# Altium PCB PoHalf.PcbDoc (part 2 of 2)
Units mm, origin at the board's own origin, x right, y up, seen from the top; angles counter-clockwise.
Board outline 104.14 x 127 mm, 4 copper layers (Power, GND, Signal, Power GND), stack 1.656 mm thick; 106 components, 89 nets, 405 pads, 56 vias.
Unrouted connection lines stored in the file: 167.
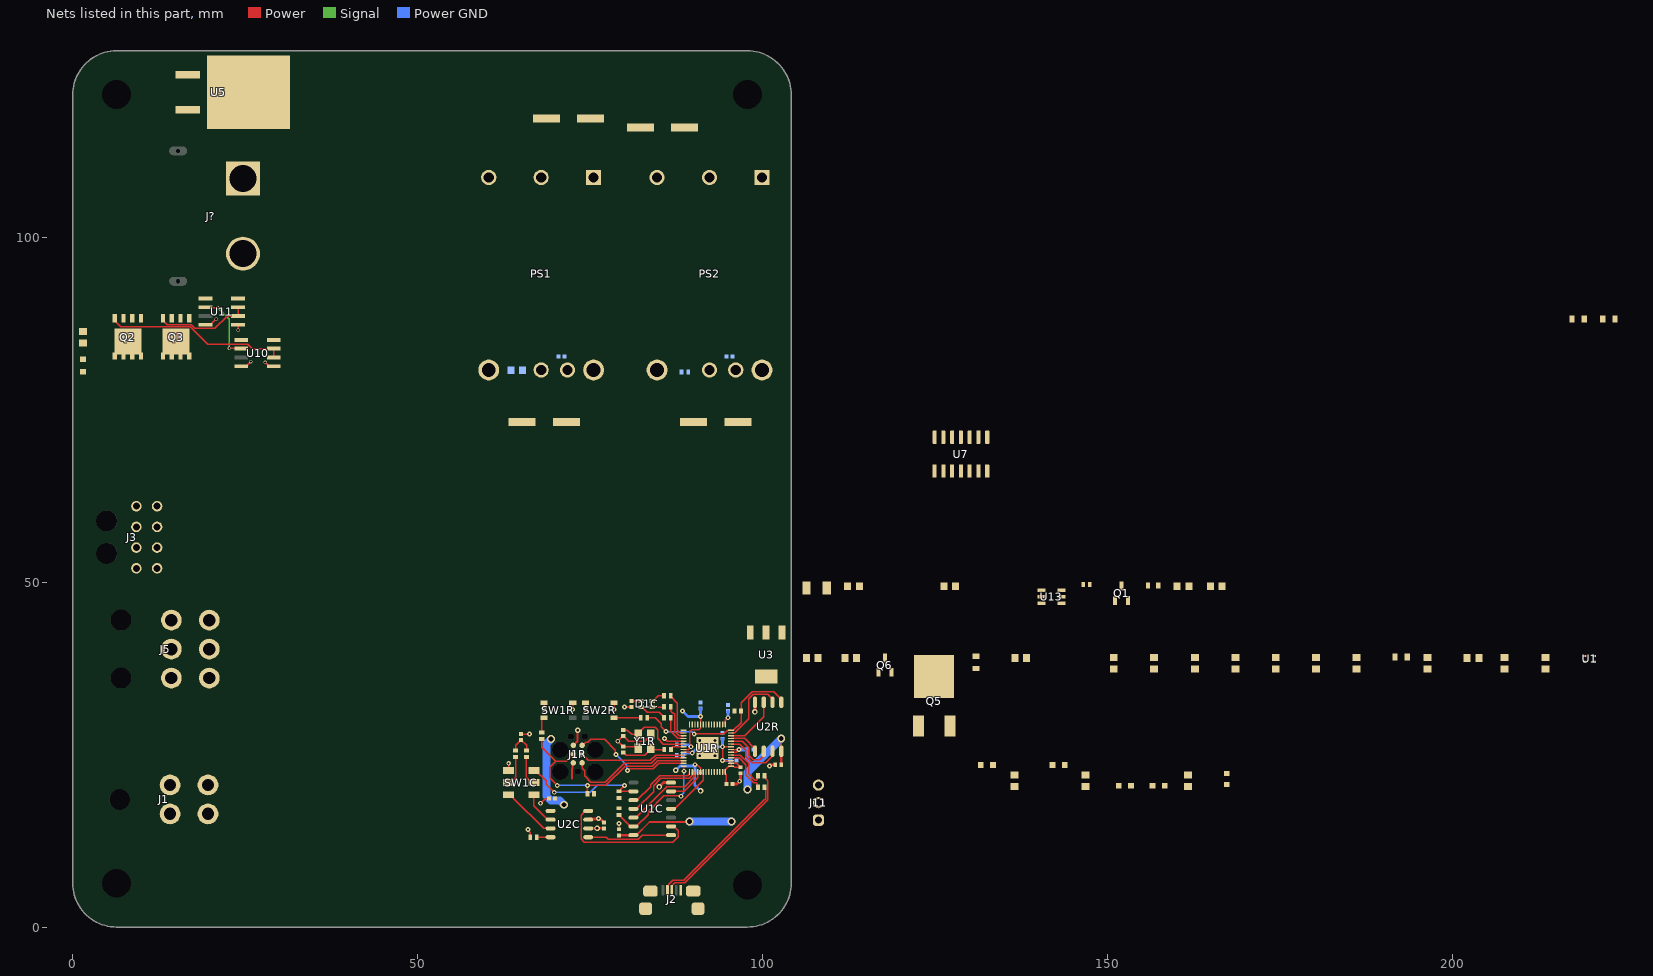
[diagram p4: the nets of this part, all layers, seen from the top]

## Part data (continued)
R20 R21 R22 R23 R27: library part RESISTOR_10K_0.5%_0603, "RES 10k OHM 0.5% 1/10W 0603", Digikey Part Numer=CR0603-JW-104ELFTR-ND, Supplier Part Number 1=749-1695-1-ND, Tolerance="+/- 0.5%", Value  (Ohms)=10K, Made By="Robert Pafford", Supplier=Digikey, Supplier 1=Digi-Key, Wattage=1/10W
R24 R25 R26: library part RESISTOR_1K_0.5%_0603, "RES 1k OHM 0.5% 1/10W 0603", Digikey Part Numer=CR0603-JW-104ELFTR-ND, Supplier Part Number 1=749-1693-1-ND, Tolerance="+/- 0.5%", Value  (Ohms)=1K, Made By="Robert Pafford", Supplier=Digikey, Supplier 1=Digi-Key, Wattage=1/10W
R32 R33: library part RESISTOR_4.7K_0603, "RES 4.7k OHM 5% 1/10W 0603", Digikey Part Numer=CR0603-JW-104ELFTR-ND, Supplier Part Number 1=RMCF0603JT4K70CT-ND, Tolerance="+/- 5%", Value  (Ohms)=4.7K, Made By="Robert Pafford", Supplier=Digikey, Supplier 1=Digi-Key, Wattage=1/10W
R39: library part ERA-3AEB512V_2, "5.1 kOhms ±0.1% 0.1W, 1/10W Chip Resistor 0603 (1608 Metric) Automotive AEC-Q200 Thin Film", Manufacturer_Part_Number=ERA-3AEB512V, Mfr_Name=Panasonic, Copyright="Copyright (C) 2023 Ultra Librarian. All rights reserved.", RefDes=RefDes, Type=DEV
R40 R44 R46: library part RESISTOR_3.9K_0603, "RES 3.9k OHM 1% 1/10W 0603", Supplier Part Number 1=P3.90KHCT-ND, Tolerance="+/- 1%", Value  (Ohms)=3.9K, Made By="Robert Pafford", Supplier 1=Digi-Key, Wattage=1/10W
SW1C: library part CAS-220TA_CAN_TERM, "GOLD SWITCH FLUSH SLIDE DPDT 100MA 6V", Current Rating="100 mA", Supplier Part Number 1=CAS220JCT-ND, Voltage Rating=6VDC, Contact Finish=Gold, Made By="Robert Pafford", Supplier 1=Digi-Key, Switch Function=DPDT
SW1R SW2R: library part "Tactile Switch SMD", "WS-TASV J-Bend SMT Tact Switch, SPST-NO, 16VDC, 50mA, 260g", Manufacturer="Wurth Elektronik", Operating Temperature Max=85°C, Operating Temperature Min=-40°C, Rated Current=50mA, Rated Voltage=16VDC, Category="Tact Switches", Circuit=SPST-NO, ComponentLink1Description="Website Link", ComponentLink1URL=https://www.we-online.com/redexpert/article/434123025826?ad, ComponentLink2Description="Datasheet Link", ComponentLink2URL=https://www.we-online.com/redexpert/spec/434123025826?ad, Contact Material="Stainless Steel", Contact Plating=Silver, Height=2.5mm, Length=4.2mm, Manufacturer Part Number=434123025826, Match Code=WS-TASV, Mount="Surface Mount", Operation Force=260g, Packaging="Tape and Reel", Terminal Material="Copper Alloy", Terminal Plating=Silver, Washable=No, Width=3.2mm
U1: library part SHT41-AD1B-R2, "Digital Relative Humidity Temperature Sensor, Â±1.8 / max 2.5 %RH, Â±0.2 Â°C, Ultra-Low-Power", Package=None, Supplier Part Number 1=1649-SHT41-AD1B-R2CT-ND, Availability="In Stock", Check_prices=https://www.snapeda.com/parts/SHT41-AD1B-R2/Sensirion/view-part/?ref=eda, MF=Sensirion, MP=SHT41-AD1B-R2, Price=None, Purchase-URL=https://pricing.snapeda.com/search/part/SHT41-AD1B-R2/?ref=eda, SnapEDA_Link=https://www.snapeda.com/parts/SHT41-AD1B-R2/Sensirion/view-part/?ref=snap, Supplier 1=Digi-Key
U1C: "CANbus Controller CAN 2.0 SPI Interface 14-SOIC", Made By="Robert Pafford", Max FD Rate="8 Mbps"
U1R: "Raspberry Pi RP2040", Crystal Frequency="12 MHz", Input Voltage=3.3V, Available Busses="SPI, I2C, PWM, USB", ComponentLink1Description=DigiKey, ComponentLink2Description=Datasheet, ComponentLink2URL=https://datasheets.raspberrypi.org/rp2040/rp2040-datasheet.pdf, Made By="Robert Pafford", Number of GPIOs=29
U2C: library part TJA1442AT, "CAN Interface IC High-Speed CAN Transceiver with Standby Mode", Supplier Part Number 1=771-TJA1442AT/0Z, Made By="Robert Pafford", Max Data Rate=5Mbps, Supplier 1=Mouser
U2R: "IC FLASH 128MBIT SPI/QUAD 8SOIC", Supplier Part Number 1=W25Q128JVSIQ-ND, Made By="Robert Pafford", Size=128M, Supplier 1=Digi-Key
U3: "800-mA 15-V linear voltage regulator 4-SOT-223 -40 to 125", Package="SOT-223-4 Texas Instruments", Arrow_Electronics-Purchase-URL=https://snapeda.com/shop?store=Arrow+Electronics&id=410186, Availability=Good, DigiKey-Purchase-URL=https://snapeda.com/shop?store=DigiKey&id=410186, MF="Texas Instruments", Mouser-Purchase-URL=https://snapeda.com/shop?store=Mouser&id=410186, MP=LM1117IMPX-3.3/NOPB, Price=None, SnapEDA_Link=https://www.snapeda.com/parts/LM1117IMPX-3.3/NOPB/Texas%20Instruments/view-part/410186/?ref=snap, Texas_Instruments-Purchase-URL=https://snapeda.com/shop?store=Texas+Instruments&id=410186
U5: "Diode Array 1 Pair Common Cathode 45 V Surface Mount TO-263-3, D²Pak (2 Leads + Tab), TO-263AB", Mfr_Name=Vishay, ComponentLink1Description="Supplier Link", ComponentLink1URL=https://www.digikey.com/en/products/detail/smc-diode-solutions/MBRB2545CT/6022901, Copyright="Copyright (C) 2023 Ultra Librarian. All rights reserved.", Manufacturer_Part_Number=MBRB2545CT, RefDes=RefDes, Type=DEV
U7: "16 Bit Analog to Digital Converter 4 Input 1 Sigma-Delta 14-SOIC", Package="SOIC-14 Microchip", Supplier Part Number 1=MCP3428-E/SL-ND, Availability=Unavailable, MF=Microchip, MP=MCP3428-E/SL, Price=None, SnapEDA_Link=https://www.snapeda.com/parts/MCP3428-E/SL/Microchip/view-part/13249/?ref=snap, Supplier 1=Digikey
U10 U11: "High-Side or Low-Side Gate Driver IC Non-Inverting 8-SOIC", Mfr_Name=Microchip, Supplier Part Number 1=TC4432EOA713CT-ND, Copyright="Copyright (C) 2024 Ultra Librarian. All rights reserved.", Manufacturer_Part_Number=TC4432EOA713, RefDes=RefDes, Supplier 1=Digikey, Type=DEV
U13: "IC SWITCH SPST-NOX1 25OHM 6TSOP", Mfr_Name=Vishay, Supplier Part Number 1=781-DG448DV-E3, Copyright="Copyright (C) 2024 Ultra Librarian. All rights reserved.", Manufacturer_Part_Number=DG448DV-T1-E3, RefDes=RefDes, Supplier 1=Mouser, Type=DEV
Y1R: library part CRYSTAL_12MHz_SMD_SMALL, "12 MHz ±20ppm Crystal 18pF 100 Ohms 4-SMD, No Lead (3.2x2.5mm)", Frequency="12 MHz", Load Capacitance=18pF, Supplier Part Number 1=2151-RH100-12.000-18-2030-EXT-TRCT-ND, ESR="100 Ohms", Made By="Robert Pafford", Supplier 1=Digi-Key

## Free pads (board coordinates)
  round 0 hole 4.191 unplated: 1(6.35,6.35) 1(6.35,120.65) 1(97.79,6.096) 1(97.79,120.65)

## Via types
v1: diameter 0.7, hole 0.3, Power to Power GND, 25 vias
v2: diameter 0.7, hole 0.3, Power to Power GND, tented top, 9 vias
v3: diameter 0.8, hole 0.4, Power to Power GND, 7 vias
v4: diameter 0.508, hole 0.305, Power to Power GND, tented both sides, 6 vias
v5: diameter 1.15, hole 0.7, Power to Power GND, 6 vias
v6: diameter 0.8, hole 0.4, Power to Power GND, tented top, 3 vias

## Nets (pads, with @x,y where several pads share a name; then routed paths per layer and width w, separated by ;. In a path a pad name is that pad's centre, name@x,y a point inside that pad or via, vN(x,y) a via of type N, cw(c..) or ccw(c..) an arc to the next point about the centre after c; other vN are vias at no path point)
1v1_RP2040: C11R.1 C12R.1 C13R.1 U1R.23 U1R.45 U1R.50 | length 14.4
  Power w0.2: U1R.23@88.554,25.337 89.456,25.337 89.656,25.137 v1@89.792,25.137 ; U1R.45@95.429,24.137 v1(94.192,24.137) v1(94.192,26.137) U1R.50@95.429,26.137
  Power GND w0.4: C12R.1@88.427,24.937 88.427,24.957 88.607,25.137 88.627,25.137 88.729,25.239 v1(89.792,25.239) 90.689,26.137 v1(94.192,26.137) C13R.1@94.192,27.302 ; v1(94.192,24.137) C11R.1@95.357,24.137
3V3_MEAS: R23.2 R27.1 U7.1
3V3_RP2CAN: C1.1 C1C.1 C3C.1 C3R.1 C4.1 C4R.1 C5C.1 C5R.1 C6R.1 C7R.1 C8R.1 C9R.1 C10R.1 C17.1 D1C.4 J1R.2 R1C.1 R2.1 R4C.1 R4R.1 R5R.1 R10.1 R23.1 R32.1 R33.1 R34.1 R39.1 U1.3 U1C.14 U1R.1 U1R.10 U1R.22 U1R.33 U1R.42 U1R.43 U1R.44 U1R.48 U1R.49 U2C.5 U2R.8 U3.2 U3.4 U7.6 | length 81.6
  Power w0.2: C1C.1@79.192,13.302 C1C.1@79.204,13.314 ; U1R.22@88.554,25.737 89.192,25.737 v1(89.592,26.137) 89.592,26.272 89.425,26.438 89.425,28.37 89.692,28.637 90.345,28.637 90.757,28.637 90.992,28.871 U1R.10@90.992,29.374 v1(90.992,30.537) ; v2(90.192,23.537) 90.287,23.441 90.553,23.441 90.992,23.002 U1R.33@90.992,22.499 ; U1R.1@94.592,29.374 94.592,30.01 94.918,30.337 v1(94.992,30.337) ; C10R.1@94.757,20.737 94.757,22.044 94.639,22.162 94.592,22.162 U1R.42@94.592,22.499 94.592,22.837 U1R.43@95.092,23.337 ; U1R.48@95.429,25.337 96.167,25.337 v2(96.567,25.737) U1R.49@95.429,25.737 ; C4R.1@96.792,23.172 C4R.1@96.772,23.172 ; C4R.1@96.772,23.172 96.592,23.352 96.592,23.372 96.227,23.737 U1R.44@95.429,23.737 U1R.43@95.429,23.337 95.767,23.337 95.932,23.172 C4R.1@96.772,23.172
  Power w0.25: C5C.1@80.992,32.84 81.053,32.779 82.384,32.779 D1C.4@82.392,32.787 ; U1C.14@81.254,13.314 81.679,13.314 83.607,15.242 89.329,15.242 v5(89.402,15.315) ; U2R.8@102.697,25.488 v5(102.697,27.337)
  Power w0.254: C5C.1@80.992,32.786 C5C.1@80.992,32.84
  Power w0.3: 72.392,21.537 72.343,21.585 72.343,22.888 72.463,23.008 72.463,23.713 J1R.2@72.557,23.807
  Power w0.4: C1C.1@79.204,13.314 U1C.14@81.254,13.314 ; C3R.1@102.697,23.537 U2R.8@102.697,25.488
  Power GND w0.4: v6(87.392,22.737) 88.002,23.347 88.902,23.347 88.912,23.337 89.992,23.337 v2(90.192,23.537) ; v1(88.392,31.337) 89.192,30.537 v1(90.992,30.537) C6R.1@90.992,31.702 ; C8R.1@88.427,26.439 89.154,26.439 89.456,26.137 v1(89.592,26.137) ; v2@90.174,23.337 90.174,22.454 C9R.1@90.157,22.437 90.157,20.572 v6(90.992,19.737) ; v1(94.992,30.337) C7R.1@94.992,31.302
  Power GND w0.6: v2(96.567,25.737) C5R.1@97.757,25.737 97.757,24.372 98.744,23.384
  Power GND w1.15: v5(69.336,27.253) 69.336,27.238 68.641,26.544 68.641,19.026 69.326,18.342 70.587,18.342 v5(71.192,17.737) ; v5(89.402,15.315) v5(95.498,15.315) ; v5(97.792,19.937) 97.792,22.432 98.744,23.384 v5(102.697,27.337)
5V: C3.1 C4C.1 C12.1 C80.1 J5.5 PS2.7 PS2.8 Q5.2 R7.1 R22.1 R42.1 U2C.3 U3.3 | length 2.6
  Power w0.4: U2C.3@74.717,15.572 74.793,15.648 76.103,15.648 v1(76.192,15.737) 76.287,15.641 76.502,15.641 76.972,15.172 C4C.1@76.992,15.172
5V_MEAS: R22.2 R26.1 U7.13
12V: C9.1 C81.1 J5.6 PS1.7 PS1.8 R21.1
12V_MEAS: R21.2 R25.1 U7.11
AUX_SWITCH: J1.4 R34.2 U1R.2
CANCLK_RP2CAN: U1C.6 U1R.32 | length 5.5
  Power w0.2: U1C.6@86.717,19.677 88.604,19.677 90.592,21.665 U1R.32@90.592,22.499
CANH: J5.4 SW1C.4 U2C.7 | length 8.6
  Power w0.2: SW1C.4@63.142,19.187 63.442,19.187 63.842,18.787 63.842,18.702 68.242,14.302 U2C.7@69.267,14.302 U2C.7@69.692,14.302
CANL: J5.1 SW1C.1 U2C.6 | length 5.3
  Power w0.203: SW1C.1@66.842,19.187 66.842,17.572 68.842,15.572 U2C.6@69.267,15.572 U2C.6@69.692,15.572
CANRX_RP2CAN: U1C.2 U2C.4 | length 21.5
  Power w0.2: U2C.4@74.717,16.842 74.292,16.842 73.692,16.242 73.692,12.783 74.153,12.322 86.985,12.322 87.742,13.078 87.742,13.997 87.142,14.597 U1C.2@86.717,14.597
CANTX_RP2CAN: U1C.1 U2C.1 | length 12.4
  Power w0.2: U2C.1@74.717,13.032 77.316,13.032 77.626,12.722 81.935,12.722 82.54,13.327 U1C.1@86.717,13.327
DBG_TX_RP2040: J1R.5 U1R.27 | length 18.2
  Power w0.2: J1R.5@73.827,26.347 73.865,26.347 74.336,26.818 74.667,26.818 75.096,27.247 77.081,27.247 78.662,25.667 78.662,25.107 v1(78.742,25.027) ; v1(80.392,22.687) 80.509,22.687 80.759,22.937 84.173,22.937 84.973,23.737 U1R.27@88.554,23.737
  Power GND w0.2: v1(78.742,25.027) 80.297,23.472 80.297,22.781 v1(80.392,22.687)
DC_MOTOR_1: J3.5 J3.6 J3.7 J3.8
FAN_PWR: J11.2 Q5.3
FAN_SWITCH: Q6.1 R9.1 U1R.40
FAN_TACH: J11.1 R10.2 U1R.41
GND: C1.2 C1C.2 C1R.2 C2.2 C2C.1 C2R.2 C3.2 C3C.2 C3R.2 C4.2 C4C.2 C4R.2 C5C.2 C5R.2 C6R.2 C7.2 C7R.2 C8R.2 C9.2 C9R.2 C10.2 C10R.2 C11R.2 C12.2 C12R.2 C13R.2 C17.2 C80.2 C81.2 D1.2 D2.2 D3.2 D5.2 D8.2 J1.1 J1.2 J1R.6 J2.5 J2.6 J2.7 J2.8 J2.9 J3.1 J3.2 J3.3 J3.4 J5.2 J11.3 J?.N PS1.2 PS1.3 PS1.4 PS2.2 PS2.3 PS2.4 Q1.2 Q6.2 R3.1 R6C.2 R9.2 R12.2 R13.2 R24.2 R25.2 R26.2 R27.2 SW1C.6 SW1R.B1 SW1R.B2 SW2R.B1 SW2R.B2 U1.4 U1C.7 U1R.19 U1R.57 U2C.2 U2R.4 U3.1 U7.2 U7.4 U7.5 U7.9 U7.10 U7.12 U7.14 U10.4 U10.5 U11.4 U11.5 U13.2 U13.4 Y1R.2 Y1R.4 | length 40.5
  Power w0.2: U11.4@19.238,87.295 19.949,87.295 20.754,88.1 v4(20.8,88.1) ; U11.5@23.962,87.295 23.962,86.538 v4(24,86.5) ; U10.4@24.438,81.295 25.149,81.295 v4(25.8,81.946) ; v4@27.9,81.9 27.9,81.846 28.451,81.295 U10.5@29.162,81.295 ; SW1C.6@63.142,22.687 63.192,22.737 v2(63.192,23.737) ; C2C.1@64.992,27.972 v1(66.192,27.972) ; v1(65.992,14.137) 65.992,14.032 66.317,13.707 R6C.2@66.317,13.032 ; v1(67.807,17.952) 68.46,18.605 69.016,18.605 C3C.2@69.028,18.617 ; v1(68.317,31.537) SW1R.B2@68.317,32.487 ; v1(72.467,31.537) 72.467,32.389 SW1R.B1@72.47,32.392 ; v1(74.317,31.537) SW2R.B2@74.317,32.487 ; v1(78.467,31.537) SW2R.B1@78.467,32.487 ; v2(85.792,27.337) 86.192,26.937 U1R.19@88.554,26.937 ; U1R.57@90.792,26.937 v3(90.892,27.037)
  Power w0.203: SW1R.B1@72.402,32.46 SW1R.B1@72.47,32.392 ; v1(78.992,26.937) v1@79.007,26.937 ; C1C.2@79.192,14.118 C1C.2@79.192,14.172 v1(79.192,15.007) ; Y1R.2@81.992,25.905 81.724,26.172 C2R.2@79.792,26.172 79.772,26.172 v1@79.007,26.937 ; Y1R.4@83.77,27.937 83.77,27.787 82.918,26.935 80.578,26.935 79.812,27.702 C1R.2@79.792,27.702 79.772,27.702 v1@79.007,26.937
  Power w0.25: v1(79.992,31.902) C5C.2@80.992,31.902
  Power w0.3: J1R.6@72.557,26.347 73.189,26.979 v3(73.189,28.545)
  Power w0.4: U2C.2@74.717,14.302 74.734,14.319 75.974,14.319 v3(75.992,14.337) 76.009,14.319 76.974,14.319 C4C.2@76.992,14.302 ; v3(85.005,20.323) 85.628,20.947 U1C.7@86.717,20.947 ; C10R.2@95.627,20.737 95.632,20.731 96.261,20.731 v1(96.667,21.137) 96.667,21.218 96.792,21.343 C4R.2@96.792,22.302 ; v6(98.887,31.184) U2R.4@98.887,32.588 ; v1(100.992,23.337) 101.192,23.537 C3R.2@101.827,23.537
  other v3: 90.892,24.837 93.092,24.837 93.092,27.037
  other v4: 27.909,81.839
INT_RP2CAN: U1C.4 U1R.34 | length 7.5
  Power w0.2: U1C.4@86.717,17.137 87.25,17.137 91.392,21.278 U1R.34@91.392,22.437
KILL_FEEDBACK: Q1.3 R2.2
KILL_SWITCH: J1.3 R8.2
LEDB_RP2CAN: R8C.1 U1R.18 | length 4.3
  Power w0.2: R8C.1@86.667,30.337 86.667,28.39 87.719,27.337 U1R.18@88.554,27.337
LEDG_RP2CAN: R7C.1 U1R.17 | length 5.4
  Power w0.2: R7C.1@86.667,31.937 86.667,31.337 86.917,31.086 86.991,31.086 87.242,30.836 87.242,28.38 87.885,27.737 U1R.17@88.554,27.737
LEDR_RP2CAN: R5C.1 U1R.16 | length 6.5
  Power w0.2: R5C.1@86.667,33.537 86.667,33.437 87.642,32.462 87.642,28.546 88.051,28.137 U1R.16@88.554,28.137
MISO_RP2CAN: U1C.12 U1R.31 | length 12.1
  Power w0.2: U1C.12@81.267,15.867 81.583,15.867 86.063,20.347 88.708,20.347 90.192,21.83 U1R.31@90.192,22.499
MOSI_RP2CAN: U1C.11 U1R.30 | length 11.5
  Power w0.2: U1C.11@81.267,17.137 81.692,17.137 84.192,19.637 84.192,20.5 85.238,21.547 89.342,21.547 89.792,21.996 U1R.30@89.792,22.499
MOTOR_EN: R1.1 R5.2 U13.6
MOTOR_PWR: Q2.D Q3.D R46.1
nCS_RP2CAN: R4C.2 U1C.13 U1R.28 | length 16.4
  Power w0.2: R4C.2@79.192,16.262 79.292,16.262 79.467,16.087 79.467,15.972 80.842,14.597 U1C.13@81.267,14.597 81.692,14.597 83.398,16.303 83.398,16.743 85.662,19.007 88.122,19.007 v2(88.161,18.967) ; U1R.28@88.554,23.337 88.592,23.337 v2(88.592,22.597)
  Power GND w0.2: v2(88.161,18.967) 88.161,19.025 88.592,19.456 v2(88.592,22.597)
NetC2_1: C2.1 Q1.1 R6.2 R8.1 U13.1
NetC2C_2: C2C.2 R2C.2 R3C.2 | length 3.7
  Power w0.2: R3C.2@64.192,25.612 64.192,26.322 64.972,27.102 C2C.2@64.992,27.102 65.012,27.102 65.792,26.322 R2C.2@65.792,25.612
NetC2R_1: C2R.1 R1R.2 Y1R.3 | length 6.7
  Power w0.203: C2R.1@79.792,25.302 79.812,25.302 80.21,24.903 82.918,24.903 83.77,25.755 Y1R.3@83.77,25.905 83.938,25.737 R1R.2@85.743,25.737
NetD1_1: D1.1 R40.2
NetD1C_1: D1C.1 R5C.2 | length 2
  Power w0.2: D1C.1@83.992,32.787 84.117,32.787 84.867,33.537 R5C.2@85.717,33.537
NetD1C_2: D1C.2 R7C.2 | length 1.7
  Power w0.2: D1C.2@83.992,31.887 85.667,31.887 R7C.2@85.717,31.937
NetD1C_3: D1C.3 R8C.2 | length 4
  Power w0.2: D1C.3@82.392,31.887 82.517,31.887 83.242,31.162 84.991,31.162 85.717,30.437 R8C.2@85.717,30.337
NetD2_1: D2.1 R39.2
NetD3_1: D3.1 R42.2
NetD5_1: D5.1 R44.2
NetD8_1: D8.1 R46.2
NetPS1_6: PS1.6 R12.1
NetPS2_6: PS2.6 R13.1
NetQ2_4: Q2.4 U10.6 U10.7 | length 26.4
  Power w0.2: Q2.4@6.095,88.23 6.095,87.9 6.986,87.01 17.05,87.01 19.56,84.5 25.364,84.5 26.029,83.835 U10.7@29.162,83.835 U10.6@29.162,82.565
NetQ3_4: Q3.4 U11.6 U11.7 | length 13.7
  Power w0.2: Q3.4@13.095,88.23 13.095,87.9 13.696,87.3 17.17,87.3 17.681,86.789 20.589,86.789 22.365,88.565 U11.6@23.962,88.565 U11.7@23.962,89.835
NetQ5_1: Q5.1 Q6.3 R7.2
NetR2C_1: R2C.1 SW1C.2 | length 4.4
  Power w0.2: R2C.1@65.792,24.662 65.742,24.612 65.742,21.737 66.542,20.937 SW1C.2@66.842,20.937
NetR3C_1: R3C.1 SW1C.5 | length 4.4
  Power w0.2: SW1C.5@63.142,20.937 63.442,20.937 64.242,21.737 64.242,24.612 R3C.1@64.192,24.662
NetR5_1: R5.1 U10.2 U11.2 | length 10.1
  Power w0.2: U11.2@19.238,89.835 19.273,89.8 v4(21,89.8) ; v4(22.7,83.9) 24.373,83.9 U10.2@24.438,83.835
  Signal w0.2: v4(21,89.8) 22.7,88.1 v4(22.7,83.9)
NetR6C_1: R6C.1 U2C.8 | length 2
  Power w0.2: R6C.1@67.267,13.032 U2C.8@69.267,13.032
NetR6R_1: R6R.1 SW1R.A2 | length 2.3
  Power w0.2: R6R.1@67.992,28.212 67.992,30.112 68.217,30.337 SW1R.A2@68.317,30.337
NetR7R_1: R7R.1 SW2R.A1 | length 3.8
  Power w0.2: SW2R.A1@78.467,30.337 R7R.1@82.317,30.337
NetU1R_5: U1R.5
NetU1R_8: U1R.8
NetU1R_9: U1R.9
NetU1R_11: U1R.11
NetU1R_12: U1R.12
NetU1R_13: U1R.13
NetU1R_14: U1R.14
NetU1R_15: U1R.15
NetU1R_35: U1R.35
NetU1R_36: U1R.36
NetU1R_37: U1R.37
NetU1R_38: U1R.38
NetU1R_39: U1R.39
PHYS_KILL: U1R.3
QSPI_SCLK_RP2040: U1R.52 U2R.6 | length 7.3
  Power w0.2: U1R.52@95.429,26.937 97.022,26.937 97.992,25.967 97.992,24.883 98.638,24.237 99.557,24.237 100.157,24.837 U2R.6@100.157,25.387
QSPI_SD0_RP2040: U1R.53 U2R.5 | length 4.5
  Power w0.2: U1R.53@95.429,27.337 97.392,27.337 98.887,25.842 U2R.5@98.887,25.387
QSPI_SD1_RP2040: U1R.55 U2R.2 | length 10.9
  Power w0.2: U1R.55@95.429,28.137 95.932,28.137 97.992,30.196 97.992,33.092 98.638,33.738 100.405,33.738 100.406,33.737 100.727,33.737 101.427,33.037 U2R.2@101.427,32.487
QSPI_SD2_RP2040: U1R.54 U2R.3 | length 7.9
  Power w0.2: U1R.54@95.429,27.737 97.392,27.737 100.157,30.502 U2R.3@100.157,32.487
QSPI_SD3_RP2040: U1R.51 U2R.7 | length 8.6
  Power w0.2: U1R.51@95.429,26.537 96.686,26.537 97.579,25.643 97.579,24.73 98.472,23.837 100.427,23.837 101.427,24.837 U2R.7@101.427,25.387
QSPI_SS_RP2040: R5R.2 R7R.2 U1R.56 U2R.1 | length 25.6
  Power w0.2: R7R.2@83.267,30.337 84.459,30.337 85.303,29.493 85.303,29.026 v2(85.992,28.337) ; v2(90.075,27.987) 94.376,27.987 94.926,28.537 U1R.56@95.429,28.537 ; U1R.56@95.767,28.537 96.867,29.637 R5R.2@96.867,31.337 96.867,32.532 98.472,34.138 101.595,34.138 102.697,33.037 U2R.1@102.697,32.487
  Power GND w0.2: v2(85.992,28.337) 89.708,28.337 90.058,27.987 v2(90.075,27.987)
RUN_RP2040: J1R.4 R4R.2 R6R.2 U1R.26 | length 32.4
  Power w0.2: R6R.2@67.992,27.262 67.992,26.096 70.016,24.072 ; v1(70.225,20.537) 70.192,20.537 69.116,21.612 69.116,23.173 70.016,24.072 ; J1R.4@72.557,25.077 71.552,24.072 70.016,24.072 ; R4R.2@74.592,19.337 v1(74.592,20.537) 77.272,20.537 80.072,23.337 84.007,23.337 84.807,24.137 U1R.26@88.554,24.137
  Power GND w0.2: v1(70.225,20.537) v1(74.592,20.537)
SCK_RP2CAN: U1C.10 U1R.29 | length 10.2
  Power w0.2: U1C.10@81.267,18.407 81.781,18.407 83.746,20.372 83.746,20.62 85.073,21.947 89.176,21.947 89.392,22.162 U1R.29@89.392,22.499
SCL: R33.2 U1.2 U1R.7 U7.8
SDA: R32.2 U1.1 U1R.6 U7.7
SOFTWARE_KILL: R3.2 U1R.4 U13.3
SWCLK_RP2040: J1R.3 U1R.24 | length 15.4
  Power w0.2: J1R.3@73.827,25.077 74.727,24.177 83.716,24.177 84.476,24.937 U1R.24@88.554,24.937
SWDIO_RP2040: J1R.1 U1R.25 | length 18.3
  Power w0.2: J1R.1@73.827,23.807 73.827,23.031 74.196,22.661 74.196,21.901 75.096,21.002 77.159,21.002 79.934,23.777 83.881,23.777 84.641,24.537 U1R.25@88.554,24.537
TERM_DET_RP2CAN: R1C.2 SW1C.3 U1C.9 | length 18.4
  Power w0.2: SW1C.3@66.842,22.687 67.142,22.687 68.621,21.207 68.621,20.707 v1(69.792,19.537) ; R1C.2@79.192,19.677 R1C.2@79.292,19.677 ; v2(79.992,20.537) 79.467,20.012 79.467,19.852 R1C.2@79.292,19.677 ; U1C.9@81.267,19.677 R1C.2@79.292,19.677
  Power GND w0.2: v1(69.792,19.537) 74.992,19.537 75.992,20.537 v2(79.992,20.537)
USB_N: J2.2 R3R.1 | length 22
  Power w0.2: J2.2@86.188,5.342 86.188,5.992 86.288,6.092 86.294,6.092 86.411,6.209 86.411,6.227 86.955,6.771 88.559,6.771 100.163,18.375 100.416,18.628 100.416,20.11 R3R.1@100.267,20.26 R3R.1@100.361,20.355
USB_P: J2.3 R2R.1 | length 23.5
  Power w0.2: J2.3@86.838,5.342 86.838,5.992 86.938,6.092 86.944,6.092 87.061,6.209 87.061,6.227 87.253,6.419 88.705,6.419 100.516,18.229 100.769,18.482 100.769,21.235 100.641,21.362 100.559,21.362 100.442,21.479 100.442,21.762 R2R.1@100.267,21.937
USB_RP2040_N: R3R.2 U1R.46 | length 6.8
  Power w0.2: U1R.46@95.429,24.537 96.582,24.537 97.556,23.563 97.556,22.058 98.715,20.898 99.105,20.898 99.222,20.781 99.222,20.355 R3R.2@99.317,20.26
USB_RP2040_P: R2R.2 U1R.47 | length 6.8
  Power w0.2: U1R.47@95.429,24.937 96.748,24.937 97.956,23.729 97.956,22.223 98.881,21.298 99.105,21.298 99.222,21.415 99.222,21.842 R2R.2@99.317,21.937
V+: J5.3 J?.P Q2.1 Q2.2 Q2.3 Q3.1 Q3.2 Q3.3 R1.2 R6.1 R44.1 U5.1 U5.3 U10.1 U10.8 U11.1 U11.8 U13.5
Vreg: C7.1 C10.1 PS1.1 PS2.1 R20.1 R40.1 U5.2
Vreg_MEAS: R20.2 R24.1 U7.3
XIN_RP2040: C1R.1 U1R.20 Y1R.1 | length 11.3
  Power w0.2: C1R.1@79.792,28.572 79.824,28.539 80.392,28.539 80.994,27.937 Y1R.1@81.992,27.937 81.992,28.087 82.842,28.937 84.444,28.937 84.792,28.589 84.792,27.337 85.592,26.537 U1R.20@88.554,26.537
XOUT_RP2040: R1R.1 U1R.21 | length 2.1
  Power w0.2: R1R.1@86.693,25.737 86.693,25.837 86.993,26.137 U1R.21@88.554,26.137
pads on no net: J1. J1R.A J1R.B J1R.C J1R.D J1R.E J1R.F J1R.G J2.1 J2.4 J3.9 J3.10 J5. J?.S1 J?.S2 SW1R.A1 SW2R.A2 U1C.3 U1C.5 U1C.8 U10.3 U11.3

## Polygon pours and split planes (outlines as drawn)
5V on Power "NONET_L-01_P-001" (solid, remove dead copper, pour order 12): 94,81 95.5,82.5 101.5,82.5 102.5,81.5 102.5,48 99.5,45 99.5,41 96.5,41 94,43.5 94,80.5
3V3_RP2CAN on Power "3V3_RP2040" (solid, pour order 0): 104.192,12.831 67.901,12.831 67.901,36.199 104.192,36.199
Vreg on Power "NONET_L-01_P-001" (solid, remove dead copper, pour order 11): 81,118 84,118 92,110 93,110 96,107 102.5,107 103.5,108 103.5,112 101.5,114 95.5,114 83,126.5 81,126.5
Vreg on Power "NONET_L-01_P-001" (solid, remove dead copper, pour order 10): 78.5,117 79.5,118 71.5,118 72.5,117 72.5,109 74,107.5 77,107.5 78.5,109
V+ on Power (solid, remove dead copper, pour order 7): 6.75,87.75 7.25,87.25 10.25,87.25 10.75,87.75 10.75,88.25 11.75,89.25 13.5,89.25 13.75,89 13.75,87.75 14,87.5 17.25,87.5 17.5,87.75 17.5,89.75 18.25,90.5 25,90.5 25.25,90.25 25.25,86.75 24,85.5 23.5,85.5 23.25,85.25 23.25,85 23.5,84.75 30.25,84.75 30.5,85 30.5,108.25 27.5,111.25 24.25,114.5 20,114.5 19,115.5 19,124 18,125 15.5,125 12.6,122.1 12.6,110.6 17.7,105.5 17.7,91.05 17.7,105.5 12.6,110.6 6.75,104.75
Vreg on Power "NONET_L-01_P-001" (solid, remove dead copper, pour order 2): 31.5,115 20,115 19.5,115.5 19.5,126.5 81,126.5 81,118 70.5,118 53.5,118 45.5,118 34.5,118
MOTOR_PWR on Power "NONET_L-01_P-001" (solid, remove dead copper, pour order 1): 5.5,86.8 17.075,86.8 17.75,86.125 17.75,81.25 23.575,75.425 23.575,67.05 19.45,67.05 5,81.5 5,86.3

## Keep-outs
GND:
  lines w0.254: 0.127,49.1 48.527,49.1 57.727,58.3 57.727,102.6 53.927,106.4 33.527,106.4 28.327,101.2 28.327,96.5
Power GND:
  lines w0.254: 0.151,49.074 48.551,49.074 57.751,58.274 57.751,102.574 53.951,106.374 33.551,106.374 28.351,101.174 28.351,96.474
Keep-Out Layer:
  region: 91.694,0.254 91.694,7.366 91.948,7.62 91.948,8.255 92.202,8.509 92.202,9.017 92.329,9.144 92.456,9.144 92.456,9.271 92.583,9.398 92.583,9.652 92.837,9.906 92.837,10.033 94.107,11.303 94.361,11.303 94.742,11.684 94.996,11.684 95.377,12.065 95.885,12.065 96.139,12.319 96.901,12.319 97.028,12.446 103.886,12.446 103.886,4.699 103.505,4.318 103.505,3.937 103.124,3.556 103.124,3.175 102.743,2.794 102.743,2.667 100.965,0.889 100.203,0.889 100.076,0.762 99.949,0.635 99.822,0.635 99.568,0.381 97.917,0.381 97.79,0.254
  region: 103.886,114.427 103.886,121.539 103.632,121.793 103.632,122.428 103.378,122.682 103.378,123.19 103.251,123.317 103.124,123.317 103.124,123.444 102.997,123.571 102.997,123.825 102.743,124.079 102.743,124.206 101.473,125.476 101.219,125.476 100.838,125.857 100.584,125.857 100.203,126.238 99.695,126.238 99.441,126.492 98.679,126.492 98.552,126.619 91.694,126.619 91.693,119.415 91.821,118.872 92.075,118.491 92.075,118.11 92.456,117.729 92.456,117.348 92.837,116.967 92.837,116.84 94.615,115.062 95.377,115.062 95.504,114.935 95.631,114.808 95.758,114.808 96.012,114.554 97.79,114.427
  region: 0.253,114.554 0.253,121.539 0.507,121.793 0.507,122.428 0.761,122.682 0.761,123.19 0.888,123.317 1.015,123.317 1.015,123.444 1.142,123.571 1.142,123.825 1.396,124.079 1.396,124.206 2.666,125.476 2.921,125.603 3.301,125.857 3.556,125.984 3.936,126.238 4.447,126.368 4.698,126.492 5.438,126.619 5.587,126.619 12.445,126.619 12.318,119.38 12.192,118.872 12.064,118.491 11.937,118.11 11.683,117.729 11.557,117.348 11.302,116.967 11.176,116.84 9.398,115.316 8.762,115.062 8.635,114.935 8.508,114.808 8.381,114.808 8.001,114.808 6.9,114.554
  region: 12.445,0.254 12.445,7.239 12.319,7.493 12.191,8.128 12.065,8.382 11.937,8.89 11.683,9.144 11.683,9.271 11.556,9.525 11.302,9.779 11.302,9.906 10.032,11.176 9.779,11.303 9.397,11.557 9.144,11.684 8.762,11.938 8.384,12.063 8,12.192 6.478,12.446 0.251,12.446 0.38,5.08 0.507,4.572 0.634,4.191 0.762,3.81 1.015,3.429 1.142,3.048 1.396,2.667 1.523,2.54 3.301,1.016 3.936,0.762 4.063,0.635 4.19,0.508 4.317,0.508 4.698,0.508 5.799,0.254
  lines w0.254: 0,6.35 ccw(c6.35,6.35) 6.35,0 97.79,0 ccw(c97.79,6.35) 104.14,6.35 104.14,120.65 ccw(c97.79,120.65) 97.79,127 6.35,127 ccw(c6.35,120.65) 0,120.65 0,6.35 ; 0.254,6.35 ccw(c6.35,6.35) 6.35,0.254 12.446,0.254 12.446,6.35 ccw(c6.35,6.35) 6.35,12.446 2.032,12.446 0.254,12.446 0.254,6.35 ; 0.254,114.554 0.254,116.332 0.254,120.65 cw(c6.35,120.65) 6.35,126.746 12.446,126.746 12.446,120.65 cw(c6.35,120.65) 6.35,114.554 0.254,114.554 ; 91.694,0.254 91.694,6.35 cw(c97.79,6.35) 97.79,12.446 103.886,12.446 103.886,6.35 cw(c97.79,6.35) 97.79,0.254 91.694,0.254 ; 91.694,120.523 ccw(c97.79,120.523) 97.79,114.427 103.886,114.427 103.886,120.523 ccw(c97.79,120.523) 97.79,126.619 93.472,126.619 91.694,126.619 91.694,120.523

## Other copper
Power:
  pour cut-out: 90.164,26.002 88.894,27.272 88.894,28.415 91.18,28.415 91.18,27.526
  pour cut-out: 92.455,28.722 92.45,28.717 92.45,23.211 93.786,23.211 94.48,23.905 94.48,25.75 94.863,26.132 94.863,28.672
  pour cut-out: 81.528,12.902 86.862,12.902 86.989,13.029 86.989,19.379 83.433,19.379 81.147,17.855
  pour cut-out: 84.885,29.048 84.884,29.049 84.884,29.567 79.79,29.539 79.497,29.246 79.497,29.128 80.4,29.128 81.012,28.517 81.575,28.517 81.956,28.898 82.21,28.898
  pour cut-out: 72.115,22.481 72.218,22.754 72.218,23.59 72.064,23.743 71.302,23.743 71.302,23.108 71.556,22.854
  pour cut-out: 17.7,105.5 17.7,91.05 17.7,105.5 12.6,110.6

## Silkscreen, mask and mechanical layers (free items; w line width, h text height)
Top Overlay:
  drawing of 23 lines, arcs and shapes, not listed
  text "RESET" at 72.761,34.479 h1.02 r180
  text "BOOT" at 78.254,34.479 h1.02 r180
  text "TERM / ON" at 66.981,18.109 h1.02 r180
  text "The Underwater Robotics Team" at 27.559,5.969 h1.52
  text "'.ProjectTitle'" at 27.559,3.302 h1.52

## Text inside footprints (layer, text, board x,y; h text height)
U5: Top Overlay "*" at 16.051,127.032 h1.27 r270; Mechanical 13 "*" at 19.455,123.857 h1.27 r270
U10: Top Overlay "*" at 23.866,85.537 h1.27; Mechanical 13 "*" at 24.908,84.305 h1.27
U11: Top Overlay "*" at 18.666,91.537 h1.27; Mechanical 13 "*" at 19.708,90.305 h1.27
U13: Top Overlay "*" at 139.84,49.21 h1.27; Mechanical 13 "*" at 141.072,48.082 h1.27